# Altium PCB PCB-MAIN.PcbDoc (part 3 of 3)
Units mm, origin at the board's own origin, x right, y up, seen from the top; angles counter-clockwise.
Board outline 110 x 75 mm, 6 copper layers (F.Cu, In1.Cu, In2.Cu, In3.Cu, In4.Cu, B.Cu); 251 components, 186 nets, 1143 pads, 304 vias.
Unrouted connection lines stored in the file: 421.
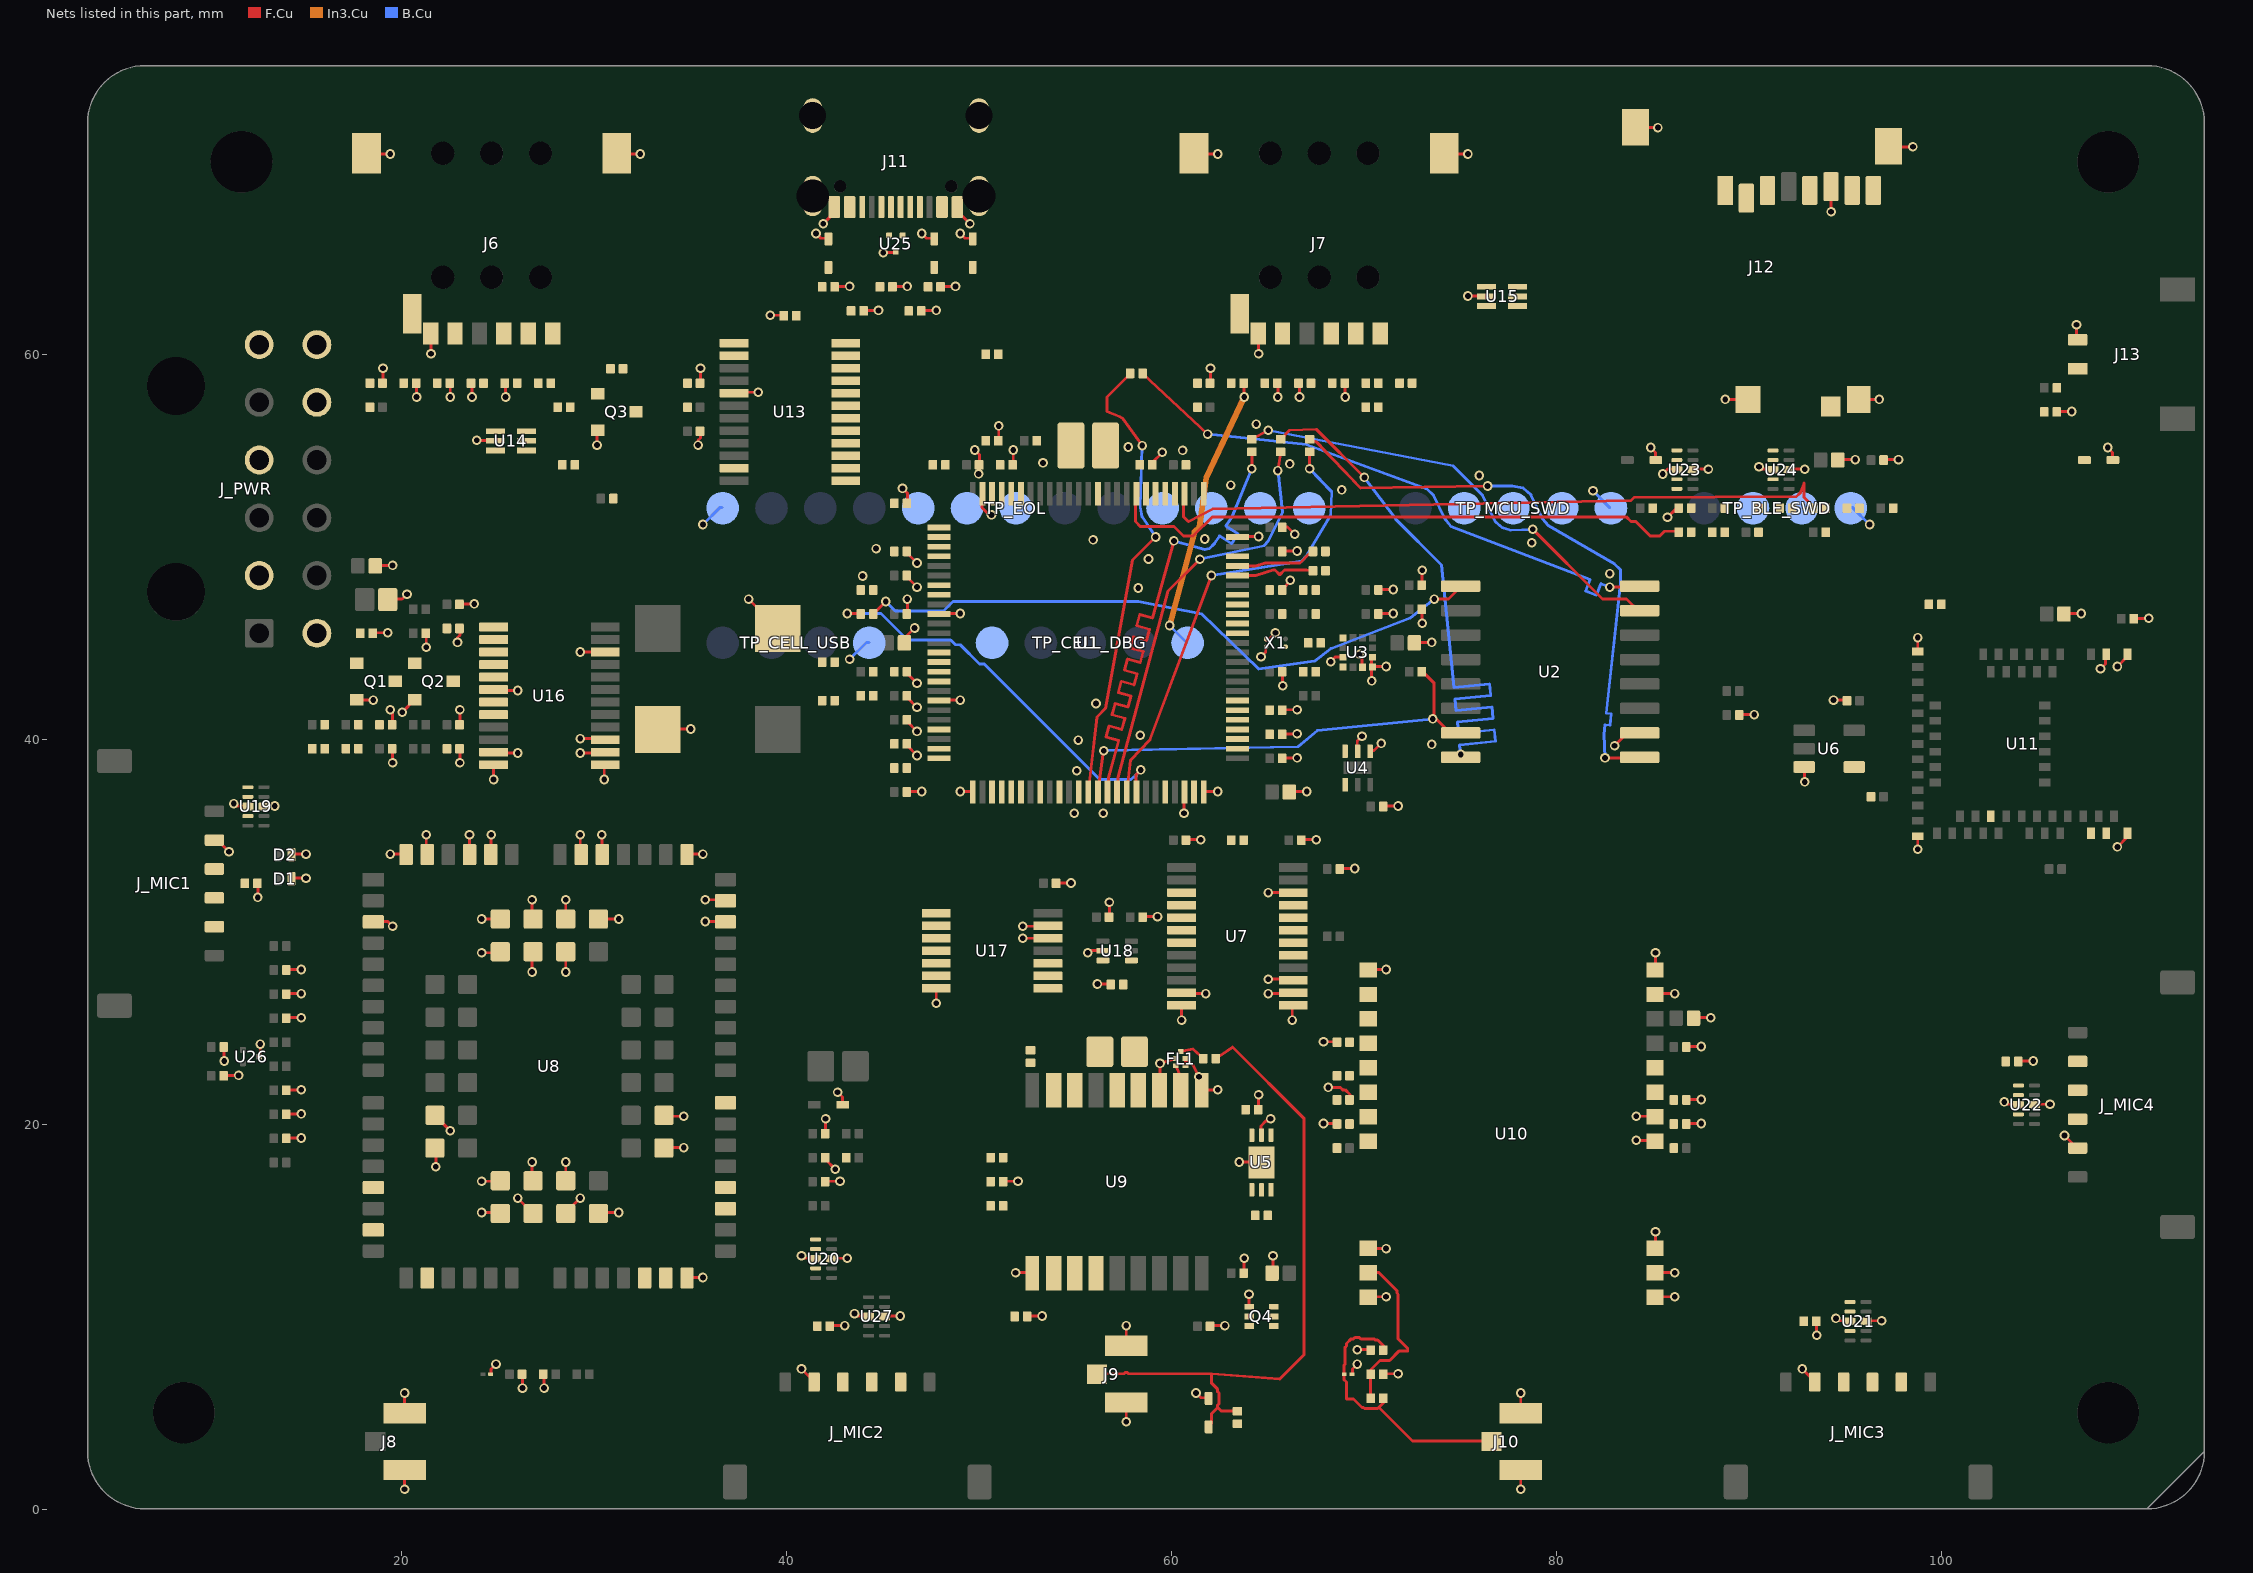
[diagram p6: the nets of this part, all layers, seen from the top]

## Via types
v1: diameter 0.5, hole 0.3, F.Cu to B.Cu, tented both sides, 304 vias

## Nets (pads, with @x,y where several pads share a name; then routed paths per layer and width w, separated by ;. In a path a pad name is that pad's centre, name@x,y a point inside that pad or via, vN(x,y) a via of type N, cw(c..) or ccw(c..) an arc to the next point about the centre after c; other vN are vias at no path point) (continued)
GND_DIGITAL: C1.2 C2.2 C3.2 C4.2 C5.2 C6.2 C7.2 C8.2 C9.2 C10.2 C11.2 C12.2 C13.2 C14.2 C15.2 C16.2 C17.2 C18.2 C19.2 C21.2 C22.2 C23.2 C24.2 C25.2 C26.2 C27.2 C28.2 C29.2 C31.2 C32.2 C60.2 C61.2 C62.2 C63.2 C65.2 C66.2 C67.2 C68.2 C69.2 C70.2 C71.2 C72.2 C73.2 C74.2 C75.2 C76.2 C77.2 C78.2 D4.2 D5.2 D6.2 D7.2 D8.2 D9.2 D11.2 FL1.B FL1.D FL1.E J9.SHIELD J10.SHIELD J11.A1 J11.A12 J11.B1 J11.B12 J12.6 J12.SHIELD J13.2 J_PWR.4 Q4.1 R2.2 R3.2 R5.2 R23.2 R60.2 R63.2 R64.2 R65.2 R66.2 R77.2 R93.2 R94.2 R96.2 R97.2 R98.2 TP_BLE_SWD.4 TP_EOL.1 TP_MCU_SWD.5 U1.10 U1.19 U1.26 U1.48 U1.50 U1.74 U1.99 U2.10 U3.3 U3.6 U3.7 U3.8 U4.4 U4.5 U5.5 U5.EP U6.3 U7.11 U7.12 U7.13 U7.14 U7.15 U7.22 U9.1 U9.10 U9.12 U10.1 U10.2 U10.3 U10.4 U10.5 U10.10 U10.11 U10.12 U10.20 U10.22 U11.1 U11.2 U11.15 U11.33 U11.55 U18.2 U23.3 U23.8 U24.3 U24.8 U25.3 X1.1 X1.4 | length 120.7
  F.Cu w0.15: C19.2@19.285,47.3 20.035,47.3 v1(20.285,47.55) ; v1(41.535,66.3) 41.785,66.05 D8.2@42.16,66.05 ; v1(41.91,66.8) 42.535,67.425 J11.B1@42.535,67.675 ; R94.2@42.535,63.55 v1(43.285,63.55) ; R98.2@44.035,62.3 v1(44.785,62.3) ; v1(45.035,65.3) U25.3@45.66,65.3 ; C77.2@45.535,63.55 v1(46.285,63.55) ; v1(46.035,53.05) 46.285,52.8 R96.2@46.285,52.3 ; C6.2@46.16,45.05 46.16,45.3 v1(46.66,45.8) ; C2.2@46.285,37.3 v1(47.035,37.3) ; C10.2@46.285,39.8 46.285,39.675 v1(46.785,39.175) ; C8.2@46.285,41.05 46.285,40.925 v1(46.785,40.425) ; C9.2@46.285,42.3 46.285,42.175 v1(46.785,41.675) ; C11.2@46.285,43.55 46.285,43.425 v1(46.785,42.925) ; C1.2@46.285,46.55 v1(46.285,47.3) ; C7.2@46.285,48.55 46.285,48.425 v1(46.785,47.925) ; R5.2@46.285,49.8 46.285,49.675 v1(46.785,49.175) ; R97.2@47.035,62.3 v1(47.785,62.3) ; v1(47.035,66.3) 47.285,66.05 D7.2@47.66,66.05 ; U1.19@47.91,42.05 v1(49.035,42.05) ; U1.10@47.91,46.55 v1(49.035,46.55) ; R93.2@48.035,63.55 v1(48.785,63.55) ; J11.B12@48.91,67.675 48.91,67.425 v1(49.535,66.8) ; v1(49.035,37.3) U1.26@49.66,37.3 ; v1(49.035,66.3) 49.285,66.05 D6.2@49.66,66.05 ; v1(49.785,55.05) 50.035,54.8 C5.2@50.035,54.3 ; U1.99@50.16,52.8 50.16,52.05 50.41,51.8 50.535,51.8 v1(50.66,51.675) ; C17.2@51.035,55.55 v1(51.035,56.3) ; C63.2@51.285,17.05 v1(52.035,17.05) ; C15.2@51.785,54.3 v1(51.785,55.05) ; v1(51.91,12.3) U9.1@52.785,12.3 ; R60.2@52.535,10.05 v1(53.285,10.05) ; v1(55.66,28.925) 55.785,29.05 U18.2@56.41,29.05 ; v1(56.16,27.3) R23.2@56.91,27.3 ; C31.2@56.785,30.8 v1(56.785,31.55) ; v1(57.66,4.55) J9.SHIELD@57.66,5.55 ; J9.SHIELD@57.66,8.55 v1(57.66,9.55) ; C32.2@58.535,30.8 v1(59.285,30.8) ; C18.2@59.035,54.3 59.035,54.425 v1(59.535,54.925) ; U9.12@59.41,21.8 v1(59.41,23.175) FL1.B@60.235,23.425 ; v1(60.535,25.425) U7.12@60.535,26.175 ; U7.11@60.535,26.8 v1(61.785,26.8) ; v1(60.66,36.175) U1.48@60.66,37.3 ; FL1.E@60.735,23.05 FL1.D@60.735,23.425 61.135,23.075 v1(61.435,22.475) ; C27.2@60.785,34.8 v1(61.535,34.8) ; v1(61.285,6.05) 61.535,5.8 D4.2@61.91,5.8 ; U9.10@61.535,21.8 v1(62.41,21.8) ; U1.50@61.66,37.3 v1(62.41,37.3) ; C62.2@62.035,9.55 v1(62.785,9.55) ; U1.74@63.41,50.55 v1(64.535,50.55) ; v1(63.535,18.05) U5.EP@64.66,18.05 ; C60.2@63.785,12.3 v1(63.785,13.05) ; Q4.1@64.035,10.55 v1(64.035,11.175) ; C65.2@64.535,20.8 v1(64.535,21.55) ; U5.5@64.66,19.425 64.66,19.925 64.91,20.175 65.035,20.175 v1(65.16,20.3) ; v1(64.66,44.3) 64.91,44.55 X1.1@64.91,44.8 ; X1.4@64.91,45.175 65.035,45.175 v1(65.41,45.55) ; v1(65.035,26.8) U7.14@66.285,26.8 ; v1(65.035,27.55) U7.15@66.285,27.55 ; v1(65.035,32.05) U7.22@66.285,32.05 ; C61.2@65.285,12.3 v1(65.285,13.175) ; C3.2@65.785,39.05 v1(66.535,39.05) ; C14.2@65.785,40.3 v1(66.535,40.3) ; C16.2@65.785,41.55 v1(66.535,41.55) ; v1(65.785,42.8) R2.2@65.785,43.55 ; R3.2@65.785,47.8 v1(66.185,48.275) ; C12.2@65.785,49.8 v1(66.535,49.8) ; C4.2@65.785,51.05 66.035,51.05 v1(66.41,50.675) ; C13.2@66.16,37.3 v1(67.035,37.3) ; v1(66.285,25.425) U7.13@66.285,26.175 ; C28.2@66.785,34.8 v1(67.535,34.8) ; v1(67.91,20.05) R63.2@68.66,20.05 ; v1(67.91,24.3) C68.2@68.66,24.3 ; v1(68.16,21.925) 68.785,21.925 68.91,21.8 69.035,21.8 69.285,21.55 R65.2@69.285,21.3 ; v1(68.285,44.05) 68.535,44.3 U3.3@68.91,44.3 ; C29.2@68.785,33.3 v1(69.535,33.3) ; D5.2@69.41,7.05 69.41,7.3 v1(69.66,7.55) ; v1(69.66,8.3) C70.2@70.41,8.3 ; U4.5@69.66,39.425 69.66,39.925 v1(69.91,40.175) ; v1(69.785,44.425) 69.91,44.3 U3.6@69.91,43.8 ; U10.22@70.285,11.05 v1(71.16,11.05) ; U10.20@70.285,13.55 v1(71.16,13.55) ; U10.12@70.285,28.05 v1(71.16,28.05) ; U4.4@70.285,39.425 70.535,39.425 v1(70.91,39.8) ; v1(70.41,43.05) U3.8@70.41,44.3 ; U3.7@70.41,43.8 v1(71.16,43.8) ; C23.2@70.785,46.55 v1(71.535,46.55) ; C25.2@70.785,47.8 v1(71.535,47.8) ; C69.2@71.035,7.05 v1(71.785,7.05) ; C26.2@71.035,36.55 v1(71.785,36.55) ; C24.2@72.66,45.05 v1(73.535,45.05) ; v1(73.035,46.05) C21.2@73.035,46.8 ; C22.2@73.035,48.05 v1(73.035,48.8) ; v1(78.16,1.05) J10.SHIELD@78.16,2.05 ; J10.SHIELD@78.16,5.05 v1(78.16,6.05) ; v1(83.035,39.675) 83.66,40.3 U2.10@84.285,40.3 ; v1(84.16,19.175) U10.4@85.16,19.175 ; v1(84.16,20.425) U10.5@85.16,20.425 ; J12.SHIELD@84.16,71.8 v1(85.285,71.8) ; v1(84.91,55.175) 85.16,54.925 D11.2@85.16,54.55 ; U10.1@85.16,11.05 v1(86.16,11.05) ; U10.2@85.16,12.3 v1(86.16,12.3) ; U10.3@85.16,13.55 v1(85.16,14.425) ; U10.10@85.16,26.8 v1(86.16,26.8) ; U10.11@85.16,28.05 v1(85.16,28.925) ; v1(85.535,53.8) 85.785,54.05 U23.3@86.285,54.05 ; v1(85.785,51.55) 86.285,52.05 C76.2@86.41,52.05 ; R64.2@86.785,20.05 v1(87.535,20.05) ; R66.2@86.785,21.3 v1(87.535,21.3) ; C66.2@86.785,24.05 v1(87.535,24.05) ; C67.2@87.16,25.55 v1(88.035,25.55) ; U23.8@87.16,54.05 v1(87.91,54.05) ; v1(88.785,57.675) J12.SHIELD@89.91,57.675 ; R77.2@89.535,41.3 v1(90.285,41.3) ; v1(90.535,54.175) 90.66,54.05 U24.3@91.285,54.05 ; U24.8@92.16,54.05 v1(92.91,54.05) ; v1(92.91,37.8) U6.3@92.91,38.55 ; v1(94.285,67.425) J12.6@94.285,68.675 ; v1(94.41,42.05) C73.2@95.16,42.05 ; C75.2@94.66,54.55 v1(95.535,54.55) ; J12.SHIELD@95.66,57.675 v1(96.785,57.675) ; C74.2@97.035,54.55 v1(97.785,54.55) ; J12.SHIELD@97.285,70.8 v1(98.535,70.8) ; v1(98.785,34.3) U11.33@98.785,34.925 ; U11.15@98.785,44.55 v1(98.785,45.3) ; C78.2@106.035,57.05 v1(106.785,57.05) ; C72.2@106.41,46.55 v1(107.285,46.55) ; J13.2@107.035,60.8 v1(107.035,61.55) ; v1(108.285,43.675) 108.535,43.925 U11.2@108.535,44.425 ; v1(108.66,55.175) 108.91,54.925 D9.2@108.91,54.55 ; v1(109.16,34.425) 109.66,34.925 U11.55@109.66,35.175 ; v1(109.16,43.8) 109.66,44.3 U11.1@109.66,44.425 ; C71.2@110.035,46.3 v1(110.785,46.3)
  B.Cu w0.15: v1(35.66,51.175) 36.535,52.05 TP_EOL.1@36.66,52.05 ; v1(81.91,52.925) TP_MCU_SWD.5@82.785,52.05 ; TP_BLE_SWD.4@95.285,52.05 95.41,52.05 v1(96.285,51.175)
  other v1: 54.96,36.175 56.46,36.175 55.085,38.375 73.535,39.75 55.16,39.975 58.385,40.225 56.085,41.875 58.285,47.875 43.96,48.5 82.785,48.625 58.814,49.384 44.66,49.925 78.735,50.225 55.935,50.375 61.735,50.425 68.86,52.975 63.085,53.225 76.001,53.725 49.985,53.805 66.16,54.325 53.335,54.375 60.585,55.025 57.76,55.2 64.411,56.392
GND_MIC: C20.2 C30.2 J_MIC1.2 J_MIC2.2 J_MIC3.2 J_MIC4.2 J_PWR.6 R19.2 R20.2 R21.2 R22.2 U17.7 U17.12 U17.13 U19.3 U19.8 U20.3 U20.8 U21.3 U21.8 U22.3 U22.8 | length 17.5
  F.Cu w0.15: J_MIC1.2@10.285,34.8 10.41,34.8 v1(11.035,34.175) ; v1(11.285,36.675) 11.41,36.55 U19.3@12.035,36.55 ; v1(12.535,31.8) R19.2@12.535,32.55 ; U19.8@12.91,36.55 v1(13.41,36.55) ; C20.2@18.66,49.05 v1(19.535,49.05) ; v1(40.785,7.3) J_MIC2.2@41.41,6.675 ; v1(40.785,13.175) 40.91,13.05 U20.3@41.535,13.05 ; R20.2@42.285,9.55 v1(43.035,9.55) ; U20.8@42.41,13.05 v1(43.16,13.05) ; v1(47.785,26.3) U17.7@47.785,27.05 ; v1(52.285,29.675) U17.12@53.535,29.675 ; v1(52.285,30.3) U17.13@53.535,30.3 ; C30.2@54.035,32.55 v1(54.785,32.55) ; v1(92.785,7.3) J_MIC3.2@93.41,6.675 ; v1(93.535,9.05) R21.2@93.535,9.8 ; v1(94.535,9.925) 94.66,9.8 U21.3@95.285,9.8 ; U21.8@96.16,9.8 v1(96.91,9.8) ; v1(103.285,21.175) 103.41,21.05 U22.3@104.035,21.05 ; R22.2@104.035,23.3 v1(104.785,23.3) ; U22.8@104.91,21.05 v1(105.66,21.05) ; v1(106.41,19.425) J_MIC4.2@107.035,18.8
GND_MODEM: C33.2 C34.2 C35.2 C36.2 C37.2 C38.2 C39.2 C40.2 C41.2 C42.2 C43.2 C44.2 C45.2 C46.2 C47.2 C48.2 C49.2 C50.2 C51.2 C52.2 C53.2 C54.2 C55.2 C56.2 C57.2 C58.2 C59.2 C79.2 C80.2 D1.2 D2.2 D3.2 D10.2 J6.4 J6.SHIELD J7.4 J7.SHIELD J8.SHIELD J_PWR.2 Q1.2 Q2.2 Q3.2 R25.2 R27.2 R29.2 R34.2 R35.2 R45.2 R47.2 TP_CELL_DBG.5 TP_CELL_USB.4 U8.3 U8.31 U8.47 U8.48 U8.50 U8.54 U8.55 U8.58 U8.59 U8.61 U8.62 U8.67 U8.68 U8.69 U8.70 U8.71 U8.72 U8.73 U8.74 U8.79 U8.80 U8.81 U8.82 U8.89 U8.90 U8.91 U8.100 U8.101 U8.102 U13.5 U14.2 U15.2 U16.6 U16.11 U16.12 U16.13 U16.14 U16.15 U16.22 U26.3 U27.3 U27.8 | length 101.3
  F.Cu w0.15: C37.2@10.785,22.55 v1(11.535,22.55) ; v1(10.785,23.3) C38.2@10.785,24.05 ; U26.3@12.66,23.55 v1(12.66,24.175) ; C45.2@14.035,19.3 v1(14.785,19.3) ; C41.2@14.035,20.55 v1(14.785,20.55) ; C39.2@14.035,21.8 v1(14.785,21.8) ; C40.2@14.035,25.55 v1(14.785,25.55) ; C43.2@14.035,26.8 v1(14.785,26.8) ; C47.2@14.035,28.05 v1(14.785,28.05) ; D1.2@14.285,32.8 v1(15.035,32.8) ; D2.2@14.285,34.05 v1(15.035,34.05) ; Q1.2@17.66,42.05 v1(18.535,42.05) ; J6.SHIELD@18.16,70.425 v1(19.41,70.425) ; U8.3@18.535,30.55 19.285,30.55 v1(19.535,30.3) ; R25.2@18.535,45.55 v1(19.285,45.55) ; C50.2@19.035,58.55 v1(19.035,59.3) ; v1(19.41,34.05) U8.62@20.285,34.05 ; v1(19.41,41.55) 19.535,41.425 R27.2@19.535,40.8 ; v1(19.535,38.8) R34.2@19.535,39.55 ; v1(20.035,41.425) Q2.2@20.66,42.05 ; v1(20.16,1.05) J8.SHIELD@20.16,2.05 ; J8.SHIELD@20.16,5.05 v1(20.16,6.05) ; v1(20.785,57.8) C52.2@20.785,58.55 ; U8.61@21.285,34.05 v1(21.285,35.05) ; v1(21.285,44.8) R29.2@21.285,45.55 ; v1(21.535,60.05) J6.4@21.535,61.05 ; v1(21.785,17.8) U8.68@21.785,18.8 ; U8.67@21.785,20.425 v1(22.535,19.675) ; v1(22.535,57.8) C54.2@22.535,58.55 ; v1(22.91,45.05) 22.91,45.3 23.035,45.425 C33.2@23.035,45.8 ; v1(23.035,38.8) C48.2@23.035,39.55 ; C35.2@23.035,40.8 v1(23.035,41.55) ; C34.2@23.035,47.05 v1(23.785,47.05) ; U8.59@23.535,34.05 v1(23.535,35.05) ; v1(23.66,57.8) C55.2@23.66,58.55 ; v1(23.91,55.55) U14.2@24.91,55.55 ; v1(24.16,15.425) U8.69@25.16,15.425 ; v1(24.16,17.05) U8.89@25.16,17.05 ; v1(24.16,28.925) U8.102@25.16,28.925 ; v1(24.16,30.675) U8.82@25.16,30.675 ; D3.2@24.66,7.05 24.66,7.3 v1(24.91,7.55) ; U8.58@24.66,34.05 v1(24.66,35.05) ; v1(24.785,37.925) U16.12@24.785,38.675 ; U16.11@24.785,39.3 v1(26.035,39.3) ; U16.6@24.785,42.55 v1(26.035,42.55) ; v1(25.41,57.8) C56.2@25.41,58.55 ; v1(26.035,16.175) U8.70@26.785,15.425 ; v1(26.285,6.3) C80.2@26.285,7.05 ; U8.90@26.785,17.05 v1(26.785,18.05) ; v1(26.785,27.925) U8.101@26.785,28.925 ; U8.81@26.785,30.675 v1(26.785,31.675) ; v1(27.41,6.3) C79.2@27.41,7.05 ; U8.71@28.535,15.425 v1(29.285,16.175) ; U8.91@28.535,17.05 v1(28.535,18.05) ; v1(28.535,27.925) U8.100@28.535,28.925 ; U8.80@28.535,30.675 v1(28.535,31.675) ; U8.55@29.285,34.05 v1(29.285,35.05) ; v1(29.285,39.3) U16.14@30.535,39.3 ; v1(29.285,40.05) U16.15@30.535,40.05 ; v1(29.285,44.55) U16.22@30.535,44.55 ; v1(30.16,55.3) Q3.2@30.16,56.05 ; U8.72@30.285,15.425 v1(31.285,15.425) ; U8.79@30.285,30.675 v1(31.285,30.675) ; U8.54@30.41,34.05 v1(30.41,35.05) ; v1(30.535,37.925) U16.13@30.535,38.675 ; J6.SHIELD@31.16,70.425 v1(32.41,70.425) ; C36.2@33.285,40.55 v1(35.035,40.55) ; U8.73@33.66,18.8 v1(34.66,18.8) ; U8.74@33.66,20.425 v1(34.66,20.425) ; U8.31@34.785,12.05 v1(35.66,12.05) ; U8.50@34.785,34.05 v1(35.66,34.05) ; v1(35.41,55.3) 35.41,55.55 35.535,55.675 C49.2@35.535,56.05 ; R47.2@35.535,58.55 v1(35.535,59.3) ; v1(35.785,30.55) U8.47@36.785,30.55 ; v1(35.785,31.675) U8.48@36.785,31.675 ; U13.5@37.285,58.05 v1(38.535,58.05) ; v1(38.035,47.3) C44.2@39.535,45.8 ; v1(39.16,62.05) R45.2@39.91,62.05 ; R35.2@42.035,17.05 v1(42.785,17.05) ; C46.2@42.035,18.3 42.035,18.175 v1(42.535,17.675) ; C42.2@42.035,19.55 v1(42.035,20.3) ; v1(42.66,21.675) 42.91,21.425 D10.2@42.91,21.05 ; v1(43.535,10.175) 43.66,10.05 U27.3@44.285,10.05 ; U27.8@45.16,10.05 v1(45.91,10.05) ; J7.SHIELD@61.16,70.425 v1(62.41,70.425) ; C51.2@62.035,58.55 v1(62.035,59.3) ; v1(63.785,57.8) C53.2@63.785,58.55 ; v1(64.535,60.05) J7.4@64.535,61.05 ; v1(65.535,57.8) C57.2@65.535,58.55 ; v1(66.66,57.8) C58.2@66.66,58.55 ; v1(69.035,57.8) C59.2@69.035,58.55 ; J7.SHIELD@74.16,70.425 v1(75.41,70.425) ; v1(75.41,63.05) U15.2@76.41,63.05
  In3.Cu w0.3: v1(59.91,45.925) 61.21,50.8 61.46,51.05 61.81,53.6 v1(63.785,57.8)
  B.Cu w0.15: v1(43.285,44.175) 44.16,45.05 TP_CELL_USB.4@44.285,45.05 ; v1(59.91,45.925) TP_CELL_DBG.5@60.785,45.05
GNSS_ANT_BIAS_RAW: C65.1 Q4.4 R61.1 U5.3 U5.4 U9.14
GNSS_ANT_DETECT: U5.6 U9.16
GNSS_ANT_DIV: R59.2 R60.1 U5.1
GNSS_ANT_GATE: Q4.5 Q4.6 R61.2
GNSS_ANT_OFF_N: Q4.2 U9.13
GNSS_ANT_SHORT_N: C63.1 L2.1 R62.2 U5.2 U9.17
GNSS_ANT_SWITCHED: Q4.3 R59.1 R62.1
GNSS_PPS_U1: R58.2 U1.22
GNSS_PPS_U9: R58.1 U9.4
GNSS_RF_ANT_BIASED: C64.1 D4.1 J9.1 L2.2 | length 34.1
  F.Cu w0.151: J9.1@56.16,7.05 57.535,7.05 57.597,7.113 57.722,7.113 57.785,7.05 62.097,7.05 ; D4.1@61.91,4.3 62.097,4.488 62.097,4.988 62.41,5.3 ; C64.1@62.31,23.425 63.185,24.025 66.885,20.325 66.885,8.025 65.635,6.775 62.097,7.05 ; L2.2@63.41,5.113 62.597,5.113 62.41,5.3 ; 62.097,7.05 62.097,6.55 62.41,6.238 62.41,6.112 62.472,6.05 62.472,5.487 62.41,5.425 62.41,5.3
GNSS_RF_DC_BLOCK: C64.2 FL1.C | length 1.4
  F.Cu w0.151: FL1.C@60.485,23.8 61.135,23.925 C64.2@61.66,23.425
GNSS_RF_FILTERED: FL1.A U9.11 | length 1.3
  F.Cu w0.151: FL1.A@60.235,23.05 60.485,22.475 U9.11@60.485,21.775
GNSS_RX_U1: R56.2 U1.25
GNSS_RX_U9: R56.1 U9.2
GNSS_TX_U1: R57.1 U1.24
GNSS_TX_U9: R57.2 U9.3
HW_REV0: R3.1 R4.2
HW_REV1: R5.1 R6.2
I2C2_SCL_BUS: J_PWR.11 R13.2 R15.2 TP_EOL.12 U3.1 U4.1
I2C2_SCL_U1: R15.1 U1.52
I2C2_SDA_BUS: J_PWR.12 R14.2 R16.2 TP_EOL.13 U3.4 U4.6
I2C2_SDA_U1: R16.1 U1.53
LORA_BUSY: R66.1 U1.56 U10.14
LORA_DIO1: R65.1 U1.17 U10.13
LORA_MISO_U1: R72.2 U1.30
LORA_MISO_U10: R72.1 U10.16
LORA_MOSI_U1: R71.1 U1.31
LORA_MOSI_U10: R71.2 U10.17
LORA_NSS_U1: R69.1 U1.28
LORA_NSS_U10: R68.2 R69.2 U10.19
LORA_RESET_N: C68.1 R67.2 U1.57 U10.15
LORA_RF_ANT: C70.1 D5.1 J10.1 R73.2 | length 14.5
  F.Cu w0.151: 70.785,5.3 72.535,3.55 J10.1@76.66,3.55 ; R73.2@71.035,5.8 71.035,5.55 70.722,5.238 70.035,5.238 69.972,5.3 69.91,5.3 69.472,5.738 69.097,5.738 69.097,6.613 68.972,6.737 68.972,7.488 69.035,7.55 69.035,8.425 69.097,8.488 69.097,8.613 69.347,8.863 69.472,8.863 69.535,8.925 69.785,8.925 69.847,8.863 70.535,8.863 70.597,8.8 70.722,8.8 71.035,8.488 C70.1@71.035,8.3
LORA_RF_MODULE: C69.1 R73.1 U10.21 | length 9
  F.Cu w0.151: U10.21@70.222,12.3 70.785,12.3 71.722,11.363 71.722,11.238 71.785,11.175 71.785,8.863 72.285,8.363 72.285,8.238 71.847,8.238 71.348,7.738 70.847,7.738 70.347,7.238 70.347,7.05 R73.1@70.347,5.8
LORA_RXEN: R64.1 U1.55 U10.6
LORA_SCK_U1: R70.1 U1.29
LORA_SCK_U10: R70.2 U10.18
LORA_TXEN: R63.1 U1.54 U10.7
LSE_IN: U1.8 X1.2
MIC_WAKE: R23.1 U1.67 U18.4
MIC_WAKE1: J_MIC1.5 R19.1 U17.1 U19.4
MIC_WAKE2: J_MIC2.5 R20.1 U17.2 U20.4
MIC_WAKE3: J_MIC3.5 R21.1 U17.4 U21.4
MIC_WAKE4: J_MIC4.5 R22.1 U17.5 U22.4
MIC_WAKE12_OR_1V8: U17.3 U17.9
MIC_WAKE34_OR_1V8: U17.6 U17.10
MIC_WAKE_OR_1V8: U17.8 U18.3
NOR_CLK_U1: R8.1 U1.38 | length 24.2
  F.Cu w0.15: U1.38@55.685,37.275 56.135,41.175 56.585,41.625 57.985,49.325 v1(59.185,50.525) ; R8.1@57.91,59.05 56.66,57.8 56.66,57.05 57.335,56.775 57.485,56.675 v1(58.485,55.275)
  B.Cu w0.15: v1(58.485,55.275) 58.385,52.075 58.485,51.575 v1(59.185,50.525)
NOR_CLK_U2: R8.2 U2.16 | length 30.4
  F.Cu w0.15: R8.2@58.51,59.025 v1(61.885,55.875) ; v1(82.785,47.925) U2.16@84.285,47.925
  B.Cu w0.15: v1(61.885,55.875) 67.035,55.325 73.285,53.025 73.635,52.675 74.185,51.525 74.535,51.075 81.757,48.317 81.529,47.72 82.09,47.506 82.318,48.103 v1(82.785,47.925)
NOR_IO0_U1: R9.1 U1.40 | length 30.8
  F.Cu w0.15: U1.40@56.685,37.275 56.735,38.025 57.268,39.953 56.603,40.137 56.763,40.715 57.428,40.531 57.588,41.109 56.922,41.293 57.082,41.872 57.747,41.688 57.907,42.266 57.242,42.45 57.402,43.028 58.067,42.844 58.227,43.423 57.562,43.606 57.722,44.185 58.387,44.001 58.547,44.579 57.882,44.763 58.041,45.341 58.707,45.158 58.866,45.736 58.201,45.92 58.361,46.498 59.026,46.314 v1(60.135,50.325) ; v1(64.185,54.075) R9.1@64.185,54.95
  B.Cu w0.15: v1(60.135,50.325) 61.735,49.875 61.985,49.925 62.235,50.175 62.509,50.593 63.136,50.182 63.465,50.684 62.838,51.095 63.185,51.625 v1(64.185,54.075)
NOR_IO0_U2: R9.2 U2.15 | length 23.8
  F.Cu w0.15: R9.2@64.185,55.6 v1(65.035,56.075) ; v1(78.785,50.925) 82.41,47.3 83.66,47.3 U2.15@84.285,46.675
  B.Cu w0.15: v1(65.035,56.075) 74.635,54.225 76.185,52.675 76.835,51.325 77.185,51.025 77.635,50.875 v1(78.785,50.925)
NOR_IO1_U1: R10.1 U1.41 | length 21.7
  F.Cu w0.15: U1.41@57.185,37.275 57.235,38.025 59.835,47.725 v1(61.485,49.375) ; v1(65.535,53.975) R10.1@65.685,54.95
  B.Cu w0.15: v1(61.485,49.375) 64.835,50.075 65.035,50.325 65.785,51.825 v1(65.535,53.975)
NOR_IO1_U2: R10.2 U2.8 | length 32.9
  F.Cu w0.15: R10.2@65.685,55.6 66.135,56.075 67.535,56.125 v1(70.035,53.625) ; U2.8@75.035,39.08 v1(75.035,39.225)
  B.Cu w0.15: v1(70.035,53.625) 71.685,51.425 74.035,49.075 74.681,42.707 76.539,42.896 76.599,42.299 74.742,42.11 74.803,41.513 76.66,41.702 76.72,41.105 74.863,40.916 74.924,40.319 76.781,40.508 76.842,39.911 74.984,39.722 v1(75.035,39.225)
NOR_IO2_U1: R11.1 U1.42 | length 23.6
  F.Cu w0.15: U1.42@57.685,37.275 57.885,38.925 58.885,39.975 v1(62.085,48.525) ; v1(67.185,54.075) R11.1@67.185,54.95
  B.Cu w0.15: v1(62.085,48.525) 66.785,49.275 67.035,49.575 68.285,51.675 68.335,52.875 v1(67.185,54.075)
NOR_IO2_U2: R11.2 U2.9 | length 31
  F.Cu w0.15: R11.2@67.185,55.6 67.535,55.475 69.835,53.075 v1(76.435,53.175) ; v1(82.535,39.05) U2.9@84.285,39.05
  B.Cu w0.15: v1(76.435,53.175) 77.735,53.175 78.285,53.075 78.685,52.725 79.285,51.475 79.585,51.125 83.035,49.125 83.335,48.825 83.335,48.125 82.603,41.369 82.862,41.341 82.797,40.744 82.539,40.772 82.485,40.275 v1(82.535,39.05)
NOR_IO3_U1: R12.1 U1.43 | length 21.1
  F.Cu w0.15: v1(43.16,46.55) R12.1@43.91,46.55 ; U1.43@58.16,37.3 58.16,38.175 v1(58.41,38.425)
  B.Cu w0.15: v1(43.16,46.55) 44.91,46.55 46.285,45.175 48.535,45.175 48.785,44.925 49.035,44.925 50.035,43.925 50.285,43.925 56.285,37.925 57.91,37.925 58.035,38.05 58.16,38.05 58.16,38.175 v1(58.41,38.425)
NOR_IO3_U2: R12.2 U2.1 | length 33.5
  F.Cu w0.15: R12.2@44.535,46.55 v1(45.16,47.175) ; v1(73.66,47.3) 74.41,47.3 U2.1@75.035,47.925
  B.Cu w0.15: v1(45.16,47.175) 45.66,46.675 48.16,46.675 48.66,47.175 58.285,47.175 61.585,46.525 64.535,43.675 67.435,44.075 68.285,44.725 72.435,46.325 v1(73.66,47.3)
NOR_NCS_U2: R7.2 U1.39 U2.7 | length 24.1
  F.Cu w0.15: U1.39@56.185,37.275 56.235,37.725 v1(56.485,39.425) ; R7.2@73.035,43.55 73.66,42.925 v1@73.66,41.175 ; v1(73.585,41.075) v1@73.66,41.175 ; U2.7@75.035,40.3 74.535,40.3 v1@73.66,41.175
  B.Cu w0.15: v1(56.485,39.425) 66.585,39.625 67.585,40.475 v1(73.585,41.075)
NRF_RESET_N: R78.2 U6.4 U11.40
NRF_SWCLK: TP_BLE_SWD.3 U11.53
NRF_SWDIO: TP_BLE_SWD.2 U11.51
NRST: C18.1 R1.2 TP_MCU_SWD.4 U1.14
PDM_CLK: U1.37 U7.17
PDM_CLK_1V8_FANOUT: J_MIC1.3 J_MIC2.3 J_MIC3.3 J_MIC4.3 R17.2 U19.1 U20.1 U21.1 U22.1
PDM_CLK_1V8_U7: R17.1 U7.7
PDM_DATA1: U1.33 U7.21
PDM_DATA1_1V8: J_MIC1.4 U7.3 U19.2
PDM_DATA2: U1.87 U7.20
PDM_DATA2_1V8: J_MIC2.4 U7.4 U20.2
PDM_DATA3: U1.35 U7.19
PDM_DATA3_1V8: J_MIC3.4 U7.5 U21.2
PDM_DATA4: U1.3 U7.18
PDM_DATA4_1V8: J_MIC4.4 U7.6 U22.2
PWR_FAULT: R103.2 U1.82
PWR_GOOD: J_PWR.7 TP_EOL.7 U1.81
Q1_BASE: Q1.1 R24.2 R25.1
Q2_BASE: Q2.1 R26.2 R27.1
Q3_BASE: Q3.1 R46.2 R47.1
REV_STRAP0: TP_EOL.10 U1.95
REV_STRAP1: TP_EOL.11 U1.96
SD_CK_CARD: J12.5 R79.2 U23.5
SD_CK_U1: R79.1 U1.80
SD_CMD_CARD: J12.3 R80.2 R85.2 U23.4
SD_CMD_U1: R80.1 U1.83 | length 31
  F.Cu w0.15: U1.83@58.135,52.825 58.135,51.325 58.385,51.075 60.135,51.075 60.635,50.575 61.135,50.575 62.135,51.575 83.635,51.575 83.885,51.325 84.135,51.325 84.885,50.575 85.385,50.575 85.635,50.825 R80.1@86.385,50.825
SD_D0_CARD: J12.7 R81.2 R86.2 U24.1
SD_D0_U1: R81.1 U1.65
SD_D1_CARD: J12.8 R82.2 R87.2 U24.2
SD_D1_U1: R82.1 U1.66
SD_D2_CARD: J12.1 R83.2 R88.2 U23.1
SD_D2_U1: R83.1 U1.78 | length 35.7
  F.Cu w0.15: U1.78@60.635,52.825 60.635,51.575 60.885,51.325 62.135,51.975 83.885,52.425 84.035,52.575 92.485,52.625 92.685,52.825 92.885,53.325 92.885,52.575 R83.1@93.385,52.075
SD_D3_CARD: J12.2 R84.2 R89.2 U23.2
SD_D3_U1: R84.1 U1.79
SD_DET: C76.1 J12.CD R90.2 U1.7 U24.4
SIM1_CLK_CONN: C55.1 J6.3 R51.2 U14.4
SIM1_CLK_MUX: R51.1 U13.23
SIM1_DATA_CONN: C56.1 J6.6 R52.2 U14.5
SIM1_DATA_MUX: R52.1 U13.19
SIM1_DET: C52.1 J6.7 R48.2 U1.2 U14.6
SIM1_RST_CONN: C54.1 J6.2 R50.2 U14.3
SIM1_RST_MUX: R50.1 U13.1
SIM1_VDD_CONN: C50.1 J6.1 U13.2 U13.21 U13.22 U14.1
SIM2_CLK_CONN: C58.1 J7.3 R54.2 U15.4
SIM2_CLK_MUX: R54.1 U13.15
SIM2_DATA_CONN: C59.1 J7.6 R55.2 U15.5
SIM2_DATA_MUX: R55.1 U13.18
SIM2_DET: C53.1 J7.7 R49.2 U1.4 U15.6
SIM2_RST_CONN: C57.1 J7.2 R53.2 U15.3
SIM2_RST_MUX: R53.1 U13.13
SIM2_VDD_CONN: C51.1 J7.1 U13.11 U13.16 U13.17 U15.1
SIM_MUX_EN: R46.1 U1.1
SIM_MUX_SEL: R45.1 U1.97 U13.14 U13.24
SMPS_SW: L1.1 U1.46
SWCLK: TP_MCU_SWD.3 U1.76
SWDIO: TP_MCU_SWD.2 U1.72
TAMPER_IN_CONN: D9.1 J13.1 R99.2 R100.1
TAMPER_IN_U1: C78.1 R100.2 U1.64
TEST_UART_RX_TP: R102.1 TP_EOL.6
TEST_UART_RX_U1: R102.2 U1.15
TEST_UART_TX_TP: R101.2 TP_EOL.5
TEST_UART_TX_U1: R101.1 U1.16
U8_MAIN_DTR_1V8: U8.30 U16.8
U8_MAIN_RI_1V8: R31.2 U8.39 U16.5
U8_MAIN_RXD_1V8: U8.34 U16.7
U8_MAIN_TXD_1V8: R30.2 U8.35 U16.3
U8_PWRKEY_N: C48.1 Q1.3 U8.15
U8_RESET_N: Q2.3 U8.17
U8_STATUS_1V8: U8.20 U16.4
U8_VDD_EXT_1V8: C33.1 R30.1 R31.1 R41.1 TP_CELL_DBG.1 U8.29 U16.1 U16.2
U13_EN_N: Q3.3 R44.2 U13.20
USB_CC1: D7.1 J11.A5 R93.1
USB_CC2: D8.1 J11.B5 R94.1
USB_DM_CONN: J11.A7 J11.B7 R92.2 U25.2
USB_DM_U1: R92.1 U1.70 | length 4.2
  F.Cu w0.154: U1.70@63.435,48.525 64.385,48.525 64.885,48.675 65.285,48.818 65.385,48.818 65.635,48.57 65.885,48.818 67.035,48.818 R92.1@67.36,48.775
USB_DP_CONN: J11.A6 J11.B6 R91.2 U25.1
USB_DP_U1: R91.1 U1.71 | length 4.2
  F.Cu w0.154: U1.71@63.435,49.025 64.385,49.025 64.885,49.175 66.685,49.175 67.135,49.625 R91.1@67.36,49.775
USB_SHIELD: C77.1 J11.SHIELD R97.1 R98.1
USB_VBUS_CONN: D6.1 J11.A4 J11.A9 J11.B4 J11.B9 R95.1
USB_VBUS_SENSE: R95.2 R96.1 U1.68
VCORE_1V1: C14.1 C15.1 C16.1 C17.1 L1.2 U1.49 U1.98
VREF+: C10.1 C11.1
pads on no net: D1.Un1 D1.Un2 D2.Un1 D2.Un2 H1.Un1 H2.Un1 H3.Un1 H4.Un1 J6.5 J6.Un1 J6.Un2 J6.Un3 J6.Un4 J6.Un5 J6.Un6 J7.5 J7.Un1 J7.Un2 J7.Un3 J7.Un4 J7.Un5 J7.Un6 J8.Un1 J8.Un2 J8.Un3 J9.Un1 J9.Un2 J9.Un3 J10.Un1 J10.Un2 J10.Un3 J11.A8 J11.B8 J11.Un1 J11.Un2 J13.Un1 J13.Un2 J_MIC1.Un1 J_MIC1.Un2 J_MIC2.Un1 J_MIC2.Un2 J_MIC3.Un1 J_MIC3.Un2 J_MIC4.Un1 J_MIC4.Un2 J_PWR.Un1 J_PWR.Un2 Q1.Un1 Q1.Un2 Q1.Un3 Q2.Un1 Q2.Un2 Q2.Un3 Q3.Un1 Q3.Un2 Q3.Un3 U1.9 U1.12 U1.13 U1.18 U1.23 U1.32 U1.36 U1.69 U1.84 U1.88 U1.89 U1.90 U1.91 U2.4 U2.5 U2.6 U2.11 U2.12 U2.13 U2.14 U3.5 U3.11 U4.2 U4.EP U6.1 U7.9 U7.10 U8.1 U8.2 U8.4 U8.5 U8.6 U8.7 U8.11 U8.12 U8.13 U8.14 U8.16 U8.18 U8.19 U8.21 U8.24 U8.25 U8.26 U8.27 U8.28 U8.36 U8.37 U8.38 U8.40 U8.41 U8.42 U8.49 U8.51 U8.56 U8.57 U8.63 U8.64 U8.65 U8.66 U8.76 U8.77 U8.78 U8.83 U8.84 U8.85 U8.86 U8.87 U8.88 U8.92 U8.93 U8.94 U8.95 U8.96 U8.97 U8.98 U8.99 U9.5 U9.6 U9.9 U9.15 U9.18 U10.8 U11.3 U11.4 U11.5 U11.6 U11.7 U11.8 U11.9 U11.10 U11.11 U11.12 U11.13 U11.14 U11.16 U11.17 U11.18 U11.19 U11.20 U11.21 U11.23 U11.25 U11.26 U11.27 U11.29 U11.31 U11.32 U11.34 U11.35 U11.36 U11.37 U11.38 U11.41 U11.42 U11.43 U11.44 U11.45 U11.46 U11.47 U11.48 U11.49 U11.50 U11.52 U11.54 U11.56 U11.57 U11.58 U11.59 U11.60 U11.61 U13.3 U16.9 U16.10 U16.18 U17.11 U19.6 U19.7 U19.9 U19.10 U19.Un1 U19.Un2 U20.6 U20.7 U20.9 U20.10 U20.Un1 U20.Un2 U21.6 U21.7 U21.9 U21.10 U21.Un1 U21.Un2 U22.6 U22.7 U22.9 U22.10 U22.Un1 U22.Un2 U23.6 U23.7 U23.9 U23.10 U23.Un1 U23.Un2 U24.5 U24.6 U24.7 U24.9 U24.10 U24.Un1 U24.Un2 U27.6 U27.7 U27.9 U27.10 U27.Un1 U27.Un2

## Polygon pours and split planes (outlines as drawn)
GND_MODEM on In1.Cu "In1.Cu-GND_MODEM" (solid, remove dead copper, pour order 9): 13.685,41.025 39.685,41.025 39.685,1.025 13.685,1.025
GND_DIGITAL on In1.Cu "In1.Cu-GND_DIGITAL" (solid, remove dead copper, pour order 4): 113.035,0.675 39.885,0.675 39.885,41.225 13.485,41.225 13.485,0.675 4.335,0.675 4.335,74.375 113.035,74.375
GND_MIC on In2.Cu "In2.Cu-GND_MIC" (solid, remove dead copper, pour order 7): 113.035,45.225 97.985,45.225 97.985,34.325 113.035,34.325 113.035,0.675 89.385,0.675 89.385,29.225 66.885,29.225 66.885,24.225 47.485,24.225 47.485,0.675 39.885,0.675 39.885,41.225 13.485,41.225 13.485,0.675 4.335,0.675 4.335,74.375 113.035,74.375
GND_MODEM on In4.Cu "In4.Cu-GND_MODEM-1" (solid, remove dead copper, pour order 6): 59.694,45.365 59.645,45.042 59.665,44.808 59.73,44.582 59.838,44.373 59.985,44.189 60.164,44.037 60.37,43.923 60.594,43.852 60.828,43.825 61.062,43.845 61.288,43.91 61.497,44.018 61.681,44.165 61.833,44.344 61.947,44.55 62.018,44.774 62.045,45.042 61.988,45.39 61.849,45.681 61.619,45.941 61.395,46.091 61.062,46.205 60.744,46.221 60.461,46.161 60.304,46.378 60.044,46.51 59.81,46.516 59.591,46.433 59.424,46.276 59.331,46.083 59.312,45.883 59.363,45.68 59.498,45.489
GND_MODEM on In4.Cu "In4.Cu-GND_MODEM" (solid, remove dead copper, pour order 5): 299 vertices, not listed, extent 8.612,0.675 79.488,72.125
GND_DIGITAL on In4.Cu "In4.Cu-GND_DIGITAL" (solid, remove dead copper, pour order 8): 113.035,0.675 113.035,74.375 4.335,74.375 4.335,0.675 13.485,0.675 13.485,41.225 39.885,41.225 39.885,0.675

## Keep-outs
F.Cu:
  region: 9.078,9.016 9.467,8.958 9.849,8.862 10.22,8.73 10.575,8.562 10.913,8.359 11.229,8.125 11.52,7.86 11.785,7.569 12.019,7.253 12.222,6.915 12.39,6.56 12.522,6.189 12.618,5.807 12.676,5.418 12.695,5.025 12.676,4.632 12.618,4.243 12.522,3.861 12.39,3.49 12.222,3.135 12.019,2.797 11.785,2.481 11.52,2.19 11.229,1.925 10.913,1.691 10.575,1.488 10.22,1.32 9.849,1.188 9.467,1.092 9.078,1.034 8.685,1.015 8.292,1.034 7.903,1.092 7.521,1.188 7.15,1.32 6.795,1.488 6.457,1.691 6.141,1.925 5.85,2.19 5.585,2.481 5.351,2.797 5.148,3.135 4.98,3.49 4.848,3.861 4.752,4.243 4.694,4.632 4.675,5.025 4.694,5.418 4.752,5.807 4.848,6.189 4.98,6.56 5.148,6.915 5.351,7.253 5.585,7.569 5.85,7.86 6.141,8.125 6.457,8.359 6.795,8.562 7.15,8.73 7.521,8.862 7.903,8.958 8.292,9.016 8.685,9.035
  region: 109.078,9.016 109.467,8.958 109.849,8.862 110.22,8.73 110.575,8.562 110.913,8.359 111.229,8.125 111.52,7.86 111.785,7.569 112.019,7.253 112.222,6.915 112.39,6.56 112.522,6.189 112.618,5.807 112.676,5.418 112.695,5.025 112.676,4.632 112.618,4.243 112.522,3.861 112.39,3.49 112.222,3.135 112.019,2.797 111.785,2.481 111.52,2.19 111.229,1.925 110.913,1.691 110.575,1.488 110.22,1.32 109.849,1.188 109.467,1.092 109.078,1.034 108.685,1.015 108.292,1.034 107.903,1.092 107.521,1.188 107.15,1.32 106.795,1.488 106.457,1.691 106.141,1.925 105.849,2.19 105.585,2.481 105.351,2.797 105.148,3.135 104.98,3.49 104.848,3.861 104.752,4.243 104.694,4.632 104.675,5.025 104.694,5.418 104.752,5.807 104.848,6.189 104.98,6.56 105.148,6.915 105.351,7.253 105.585,7.569 105.849,7.86 106.141,8.125 106.457,8.359 106.795,8.562 107.15,8.73 107.521,8.862 107.903,8.958 108.292,9.016 108.685,9.035
  region: 109.078,74.016 109.467,73.958 109.849,73.862 110.22,73.73 110.575,73.562 110.913,73.359 111.229,73.125 111.52,72.86 111.785,72.569 112.019,72.253 112.222,71.915 112.39,71.56 112.522,71.189 112.618,70.807 112.676,70.418 112.695,70.025 112.676,69.632 112.618,69.243 112.522,68.861 112.39,68.49 112.222,68.135 112.019,67.797 111.785,67.481 111.52,67.19 111.229,66.925 110.913,66.691 110.575,66.488 110.22,66.32 109.849,66.188 109.467,66.092 109.078,66.034 108.685,66.015 108.292,66.034 107.903,66.092 107.521,66.188 107.15,66.32 106.795,66.488 106.457,66.691 106.141,66.925 105.849,67.19 105.585,67.481 105.351,67.797 105.148,68.135 104.98,68.49 104.848,68.861 104.752,69.243 104.694,69.632 104.675,70.025 104.694,70.418 104.752,70.807 104.848,71.189 104.98,71.56 105.148,71.915 105.351,72.253 105.585,72.569 105.849,72.86 106.141,73.125 106.457,73.359 106.795,73.562 107.15,73.73 107.521,73.862 107.903,73.958 108.292,74.016 108.685,74.035
  region: 12.078,74.016 12.467,73.958 12.849,73.862 13.22,73.73 13.575,73.562 13.913,73.359 14.229,73.125 14.52,72.86 14.785,72.569 15.019,72.253 15.222,71.915 15.39,71.56 15.522,71.189 15.618,70.807 15.676,70.418 15.695,70.025 15.676,69.632 15.618,69.243 15.522,68.861 15.39,68.49 15.222,68.135 15.019,67.797 14.785,67.481 14.52,67.19 14.229,66.925 13.913,66.691 13.575,66.488 13.22,66.32 12.849,66.188 12.467,66.092 12.078,66.034 11.685,66.015 11.292,66.034 10.903,66.092 10.521,66.188 10.15,66.32 9.795,66.488 9.457,66.691 9.141,66.925 8.849,67.19 8.585,67.481 8.351,67.797 8.148,68.135 7.98,68.49 7.848,68.861 7.752,69.243 7.694,69.632 7.675,70.025 7.694,70.418 7.752,70.807 7.848,71.189 7.98,71.56 8.148,71.915 8.351,72.253 8.585,72.569 8.849,72.86 9.141,73.125 9.457,73.359 9.795,73.562 10.15,73.73 10.521,73.862 10.903,73.958 11.292,74.016 11.685,74.035
In1.Cu:
  region: 9.078,9.016 9.467,8.958 9.849,8.862 10.22,8.73 10.575,8.562 10.913,8.359 11.229,8.125 11.52,7.86 11.785,7.569 12.019,7.253 12.222,6.915 12.39,6.56 12.522,6.189 12.618,5.807 12.676,5.418 12.695,5.025 12.676,4.632 12.618,4.243 12.522,3.861 12.39,3.49 12.222,3.135 12.019,2.797 11.785,2.481 11.52,2.19 11.229,1.925 10.913,1.691 10.575,1.488 10.22,1.32 9.849,1.188 9.467,1.092 9.078,1.034 8.685,1.015 8.292,1.034 7.903,1.092 7.521,1.188 7.15,1.32 6.795,1.488 6.457,1.691 6.141,1.925 5.85,2.19 5.585,2.481 5.351,2.797 5.148,3.135 4.98,3.49 4.848,3.861 4.752,4.243 4.694,4.632 4.675,5.025 4.694,5.418 4.752,5.807 4.848,6.189 4.98,6.56 5.148,6.915 5.351,7.253 5.585,7.569 5.85,7.86 6.141,8.125 6.457,8.359 6.795,8.562 7.15,8.73 7.521,8.862 7.903,8.958 8.292,9.016 8.685,9.035
  region: 109.078,9.016 109.467,8.958 109.849,8.862 110.22,8.73 110.575,8.562 110.913,8.359 111.229,8.125 111.52,7.86 111.785,7.569 112.019,7.253 112.222,6.915 112.39,6.56 112.522,6.189 112.618,5.807 112.676,5.418 112.695,5.025 112.676,4.632 112.618,4.243 112.522,3.861 112.39,3.49 112.222,3.135 112.019,2.797 111.785,2.481 111.52,2.19 111.229,1.925 110.913,1.691 110.575,1.488 110.22,1.32 109.849,1.188 109.467,1.092 109.078,1.034 108.685,1.015 108.292,1.034 107.903,1.092 107.521,1.188 107.15,1.32 106.795,1.488 106.457,1.691 106.141,1.925 105.849,2.19 105.585,2.481 105.351,2.797 105.148,3.135 104.98,3.49 104.848,3.861 104.752,4.243 104.694,4.632 104.675,5.025 104.694,5.418 104.752,5.807 104.848,6.189 104.98,6.56 105.148,6.915 105.351,7.253 105.585,7.569 105.849,7.86 106.141,8.125 106.457,8.359 106.795,8.562 107.15,8.73 107.521,8.862 107.903,8.958 108.292,9.016 108.685,9.035
  region: 109.078,74.016 109.467,73.958 109.849,73.862 110.22,73.73 110.575,73.562 110.913,73.359 111.229,73.125 111.52,72.86 111.785,72.569 112.019,72.253 112.222,71.915 112.39,71.56 112.522,71.189 112.618,70.807 112.676,70.418 112.695,70.025 112.676,69.632 112.618,69.243 112.522,68.861 112.39,68.49 112.222,68.135 112.019,67.797 111.785,67.481 111.52,67.19 111.229,66.925 110.913,66.691 110.575,66.488 110.22,66.32 109.849,66.188 109.467,66.092 109.078,66.034 108.685,66.015 108.292,66.034 107.903,66.092 107.521,66.188 107.15,66.32 106.795,66.488 106.457,66.691 106.141,66.925 105.849,67.19 105.585,67.481 105.351,67.797 105.148,68.135 104.98,68.49 104.848,68.861 104.752,69.243 104.694,69.632 104.675,70.025 104.694,70.418 104.752,70.807 104.848,71.189 104.98,71.56 105.148,71.915 105.351,72.253 105.585,72.569 105.849,72.86 106.141,73.125 106.457,73.359 106.795,73.562 107.15,73.73 107.521,73.862 107.903,73.958 108.292,74.016 108.685,74.035
  region: 12.078,74.016 12.467,73.958 12.849,73.862 13.22,73.73 13.575,73.562 13.913,73.359 14.229,73.125 14.52,72.86 14.785,72.569 15.019,72.253 15.222,71.915 15.39,71.56 15.522,71.189 15.618,70.807 15.676,70.418 15.695,70.025 15.676,69.632 15.618,69.243 15.522,68.861 15.39,68.49 15.222,68.135 15.019,67.797 14.785,67.481 14.52,67.19 14.229,66.925 13.913,66.691 13.575,66.488 13.22,66.32 12.849,66.188 12.467,66.092 12.078,66.034 11.685,66.015 11.292,66.034 10.903,66.092 10.521,66.188 10.15,66.32 9.795,66.488 9.457,66.691 9.141,66.925 8.849,67.19 8.585,67.481 8.351,67.797 8.148,68.135 7.98,68.49 7.848,68.861 7.752,69.243 7.694,69.632 7.675,70.025 7.694,70.418 7.752,70.807 7.848,71.189 7.98,71.56 8.148,71.915 8.351,72.253 8.585,72.569 8.849,72.86 9.141,73.125 9.457,73.359 9.795,73.562 10.15,73.73 10.521,73.862 10.903,73.958 11.292,74.016 11.685,74.035
In2.Cu:
  region: 9.078,9.016 9.467,8.958 9.849,8.862 10.22,8.73 10.575,8.562 10.913,8.359 11.229,8.125 11.52,7.86 11.785,7.569 12.019,7.253 12.222,6.915 12.39,6.56 12.522,6.189 12.618,5.807 12.676,5.418 12.695,5.025 12.676,4.632 12.618,4.243 12.522,3.861 12.39,3.49 12.222,3.135 12.019,2.797 11.785,2.481 11.52,2.19 11.229,1.925 10.913,1.691 10.575,1.488 10.22,1.32 9.849,1.188 9.467,1.092 9.078,1.034 8.685,1.015 8.292,1.034 7.903,1.092 7.521,1.188 7.15,1.32 6.795,1.488 6.457,1.691 6.141,1.925 5.85,2.19 5.585,2.481 5.351,2.797 5.148,3.135 4.98,3.49 4.848,3.861 4.752,4.243 4.694,4.632 4.675,5.025 4.694,5.418 4.752,5.807 4.848,6.189 4.98,6.56 5.148,6.915 5.351,7.253 5.585,7.569 5.85,7.86 6.141,8.125 6.457,8.359 6.795,8.562 7.15,8.73 7.521,8.862 7.903,8.958 8.292,9.016 8.685,9.035
  region: 109.078,9.016 109.467,8.958 109.849,8.862 110.22,8.73 110.575,8.562 110.913,8.359 111.229,8.125 111.52,7.86 111.785,7.569 112.019,7.253 112.222,6.915 112.39,6.56 112.522,6.189 112.618,5.807 112.676,5.418 112.695,5.025 112.676,4.632 112.618,4.243 112.522,3.861 112.39,3.49 112.222,3.135 112.019,2.797 111.785,2.481 111.52,2.19 111.229,1.925 110.913,1.691 110.575,1.488 110.22,1.32 109.849,1.188 109.467,1.092 109.078,1.034 108.685,1.015 108.292,1.034 107.903,1.092 107.521,1.188 107.15,1.32 106.795,1.488 106.457,1.691 106.141,1.925 105.849,2.19 105.585,2.481 105.351,2.797 105.148,3.135 104.98,3.49 104.848,3.861 104.752,4.243 104.694,4.632 104.675,5.025 104.694,5.418 104.752,5.807 104.848,6.189 104.98,6.56 105.148,6.915 105.351,7.253 105.585,7.569 105.849,7.86 106.141,8.125 106.457,8.359 106.795,8.562 107.15,8.73 107.521,8.862 107.903,8.958 108.292,9.016 108.685,9.035
  region: 109.078,74.016 109.467,73.958 109.849,73.862 110.22,73.73 110.575,73.562 110.913,73.359 111.229,73.125 111.52,72.86 111.785,72.569 112.019,72.253 112.222,71.915 112.39,71.56 112.522,71.189 112.618,70.807 112.676,70.418 112.695,70.025 112.676,69.632 112.618,69.243 112.522,68.861 112.39,68.49 112.222,68.135 112.019,67.797 111.785,67.481 111.52,67.19 111.229,66.925 110.913,66.691 110.575,66.488 110.22,66.32 109.849,66.188 109.467,66.092 109.078,66.034 108.685,66.015 108.292,66.034 107.903,66.092 107.521,66.188 107.15,66.32 106.795,66.488 106.457,66.691 106.141,66.925 105.849,67.19 105.585,67.481 105.351,67.797 105.148,68.135 104.98,68.49 104.848,68.861 104.752,69.243 104.694,69.632 104.675,70.025 104.694,70.418 104.752,70.807 104.848,71.189 104.98,71.56 105.148,71.915 105.351,72.253 105.585,72.569 105.849,72.86 106.141,73.125 106.457,73.359 106.795,73.562 107.15,73.73 107.521,73.862 107.903,73.958 108.292,74.016 108.685,74.035
  region: 12.078,74.016 12.467,73.958 12.849,73.862 13.22,73.73 13.575,73.562 13.913,73.359 14.229,73.125 14.52,72.86 14.785,72.569 15.019,72.253 15.222,71.915 15.39,71.56 15.522,71.189 15.618,70.807 15.676,70.418 15.695,70.025 15.676,69.632 15.618,69.243 15.522,68.861 15.39,68.49 15.222,68.135 15.019,67.797 14.785,67.481 14.52,67.19 14.229,66.925 13.913,66.691 13.575,66.488 13.22,66.32 12.849,66.188 12.467,66.092 12.078,66.034 11.685,66.015 11.292,66.034 10.903,66.092 10.521,66.188 10.15,66.32 9.795,66.488 9.457,66.691 9.141,66.925 8.849,67.19 8.585,67.481 8.351,67.797 8.148,68.135 7.98,68.49 7.848,68.861 7.752,69.243 7.694,69.632 7.675,70.025 7.694,70.418 7.752,70.807 7.848,71.189 7.98,71.56 8.148,71.915 8.351,72.253 8.585,72.569 8.849,72.86 9.141,73.125 9.457,73.359 9.795,73.562 10.15,73.73 10.521,73.862 10.903,73.958 11.292,74.016 11.685,74.035
In3.Cu:
  region: 9.078,9.016 9.467,8.958 9.849,8.862 10.22,8.73 10.575,8.562 10.913,8.359 11.229,8.125 11.52,7.86 11.785,7.569 12.019,7.253 12.222,6.915 12.39,6.56 12.522,6.189 12.618,5.807 12.676,5.418 12.695,5.025 12.676,4.632 12.618,4.243 12.522,3.861 12.39,3.49 12.222,3.135 12.019,2.797 11.785,2.481 11.52,2.19 11.229,1.925 10.913,1.691 10.575,1.488 10.22,1.32 9.849,1.188 9.467,1.092 9.078,1.034 8.685,1.015 8.292,1.034 7.903,1.092 7.521,1.188 7.15,1.32 6.795,1.488 6.457,1.691 6.141,1.925 5.85,2.19 5.585,2.481 5.351,2.797 5.148,3.135 4.98,3.49 4.848,3.861 4.752,4.243 4.694,4.632 4.675,5.025 4.694,5.418 4.752,5.807 4.848,6.189 4.98,6.56 5.148,6.915 5.351,7.253 5.585,7.569 5.85,7.86 6.141,8.125 6.457,8.359 6.795,8.562 7.15,8.73 7.521,8.862 7.903,8.958 8.292,9.016 8.685,9.035
  region: 109.078,9.016 109.467,8.958 109.849,8.862 110.22,8.73 110.575,8.562 110.913,8.359 111.229,8.125 111.52,7.86 111.785,7.569 112.019,7.253 112.222,6.915 112.39,6.56 112.522,6.189 112.618,5.807 112.676,5.418 112.695,5.025 112.676,4.632 112.618,4.243 112.522,3.861 112.39,3.49 112.222,3.135 112.019,2.797 111.785,2.481 111.52,2.19 111.229,1.925 110.913,1.691 110.575,1.488 110.22,1.32 109.849,1.188 109.467,1.092 109.078,1.034 108.685,1.015 108.292,1.034 107.903,1.092 107.521,1.188 107.15,1.32 106.795,1.488 106.457,1.691 106.141,1.925 105.849,2.19 105.585,2.481 105.351,2.797 105.148,3.135 104.98,3.49 104.848,3.861 104.752,4.243 104.694,4.632 104.675,5.025 104.694,5.418 104.752,5.807 104.848,6.189 104.98,6.56 105.148,6.915 105.351,7.253 105.585,7.569 105.849,7.86 106.141,8.125 106.457,8.359 106.795,8.562 107.15,8.73 107.521,8.862 107.903,8.958 108.292,9.016 108.685,9.035
  region: 109.078,74.016 109.467,73.958 109.849,73.862 110.22,73.73 110.575,73.562 110.913,73.359 111.229,73.125 111.52,72.86 111.785,72.569 112.019,72.253 112.222,71.915 112.39,71.56 112.522,71.189 112.618,70.807 112.676,70.418 112.695,70.025 112.676,69.632 112.618,69.243 112.522,68.861 112.39,68.49 112.222,68.135 112.019,67.797 111.785,67.481 111.52,67.19 111.229,66.925 110.913,66.691 110.575,66.488 110.22,66.32 109.849,66.188 109.467,66.092 109.078,66.034 108.685,66.015 108.292,66.034 107.903,66.092 107.521,66.188 107.15,66.32 106.795,66.488 106.457,66.691 106.141,66.925 105.849,67.19 105.585,67.481 105.351,67.797 105.148,68.135 104.98,68.49 104.848,68.861 104.752,69.243 104.694,69.632 104.675,70.025 104.694,70.418 104.752,70.807 104.848,71.189 104.98,71.56 105.148,71.915 105.351,72.253 105.585,72.569 105.849,72.86 106.141,73.125 106.457,73.359 106.795,73.562 107.15,73.73 107.521,73.862 107.903,73.958 108.292,74.016 108.685,74.035
  region: 12.078,74.016 12.467,73.958 12.849,73.862 13.22,73.73 13.575,73.562 13.913,73.359 14.229,73.125 14.52,72.86 14.785,72.569 15.019,72.253 15.222,71.915 15.39,71.56 15.522,71.189 15.618,70.807 15.676,70.418 15.695,70.025 15.676,69.632 15.618,69.243 15.522,68.861 15.39,68.49 15.222,68.135 15.019,67.797 14.785,67.481 14.52,67.19 14.229,66.925 13.913,66.691 13.575,66.488 13.22,66.32 12.849,66.188 12.467,66.092 12.078,66.034 11.685,66.015 11.292,66.034 10.903,66.092 10.521,66.188 10.15,66.32 9.795,66.488 9.457,66.691 9.141,66.925 8.849,67.19 8.585,67.481 8.351,67.797 8.148,68.135 7.98,68.49 7.848,68.861 7.752,69.243 7.694,69.632 7.675,70.025 7.694,70.418 7.752,70.807 7.848,71.189 7.98,71.56 8.148,71.915 8.351,72.253 8.585,72.569 8.849,72.86 9.141,73.125 9.457,73.359 9.795,73.562 10.15,73.73 10.521,73.862 10.903,73.958 11.292,74.016 11.685,74.035
In4.Cu:
  region: 9.078,9.016 9.467,8.958 9.849,8.862 10.22,8.73 10.575,8.562 10.913,8.359 11.229,8.125 11.52,7.86 11.785,7.569 12.019,7.253 12.222,6.915 12.39,6.56 12.522,6.189 12.618,5.807 12.676,5.418 12.695,5.025 12.676,4.632 12.618,4.243 12.522,3.861 12.39,3.49 12.222,3.135 12.019,2.797 11.785,2.481 11.52,2.19 11.229,1.925 10.913,1.691 10.575,1.488 10.22,1.32 9.849,1.188 9.467,1.092 9.078,1.034 8.685,1.015 8.292,1.034 7.903,1.092 7.521,1.188 7.15,1.32 6.795,1.488 6.457,1.691 6.141,1.925 5.85,2.19 5.585,2.481 5.351,2.797 5.148,3.135 4.98,3.49 4.848,3.861 4.752,4.243 4.694,4.632 4.675,5.025 4.694,5.418 4.752,5.807 4.848,6.189 4.98,6.56 5.148,6.915 5.351,7.253 5.585,7.569 5.85,7.86 6.141,8.125 6.457,8.359 6.795,8.562 7.15,8.73 7.521,8.862 7.903,8.958 8.292,9.016 8.685,9.035
  region: 109.078,9.016 109.467,8.958 109.849,8.862 110.22,8.73 110.575,8.562 110.913,8.359 111.229,8.125 111.52,7.86 111.785,7.569 112.019,7.253 112.222,6.915 112.39,6.56 112.522,6.189 112.618,5.807 112.676,5.418 112.695,5.025 112.676,4.632 112.618,4.243 112.522,3.861 112.39,3.49 112.222,3.135 112.019,2.797 111.785,2.481 111.52,2.19 111.229,1.925 110.913,1.691 110.575,1.488 110.22,1.32 109.849,1.188 109.467,1.092 109.078,1.034 108.685,1.015 108.292,1.034 107.903,1.092 107.521,1.188 107.15,1.32 106.795,1.488 106.457,1.691 106.141,1.925 105.849,2.19 105.585,2.481 105.351,2.797 105.148,3.135 104.98,3.49 104.848,3.861 104.752,4.243 104.694,4.632 104.675,5.025 104.694,5.418 104.752,5.807 104.848,6.189 104.98,6.56 105.148,6.915 105.351,7.253 105.585,7.569 105.849,7.86 106.141,8.125 106.457,8.359 106.795,8.562 107.15,8.73 107.521,8.862 107.903,8.958 108.292,9.016 108.685,9.035
  region: 109.078,74.016 109.467,73.958 109.849,73.862 110.22,73.73 110.575,73.562 110.913,73.359 111.229,73.125 111.52,72.86 111.785,72.569 112.019,72.253 112.222,71.915 112.39,71.56 112.522,71.189 112.618,70.807 112.676,70.418 112.695,70.025 112.676,69.632 112.618,69.243 112.522,68.861 112.39,68.49 112.222,68.135 112.019,67.797 111.785,67.481 111.52,67.19 111.229,66.925 110.913,66.691 110.575,66.488 110.22,66.32 109.849,66.188 109.467,66.092 109.078,66.034 108.685,66.015 108.292,66.034 107.903,66.092 107.521,66.188 107.15,66.32 106.795,66.488 106.457,66.691 106.141,66.925 105.849,67.19 105.585,67.481 105.351,67.797 105.148,68.135 104.98,68.49 104.848,68.861 104.752,69.243 104.694,69.632 104.675,70.025 104.694,70.418 104.752,70.807 104.848,71.189 104.98,71.56 105.148,71.915 105.351,72.253 105.585,72.569 105.849,72.86 106.141,73.125 106.457,73.359 106.795,73.562 107.15,73.73 107.521,73.862 107.903,73.958 108.292,74.016 108.685,74.035
  region: 12.078,74.016 12.467,73.958 12.849,73.862 13.22,73.73 13.575,73.562 13.913,73.359 14.229,73.125 14.52,72.86 14.785,72.569 15.019,72.253 15.222,71.915 15.39,71.56 15.522,71.189 15.618,70.807 15.676,70.418 15.695,70.025 15.676,69.632 15.618,69.243 15.522,68.861 15.39,68.49 15.222,68.135 15.019,67.797 14.785,67.481 14.52,67.19 14.229,66.925 13.913,66.691 13.575,66.488 13.22,66.32 12.849,66.188 12.467,66.092 12.078,66.034 11.685,66.015 11.292,66.034 10.903,66.092 10.521,66.188 10.15,66.32 9.795,66.488 9.457,66.691 9.141,66.925 8.849,67.19 8.585,67.481 8.351,67.797 8.148,68.135 7.98,68.49 7.848,68.861 7.752,69.243 7.694,69.632 7.675,70.025 7.694,70.418 7.752,70.807 7.848,71.189 7.98,71.56 8.148,71.915 8.351,72.253 8.585,72.569 8.849,72.86 9.141,73.125 9.457,73.359 9.795,73.562 10.15,73.73 10.521,73.862 10.903,73.958 11.292,74.016 11.685,74.035
B.Cu:
  region: 9.078,9.016 9.467,8.958 9.849,8.862 10.22,8.73 10.575,8.562 10.913,8.359 11.229,8.125 11.52,7.86 11.785,7.569 12.019,7.253 12.222,6.915 12.39,6.56 12.522,6.189 12.618,5.807 12.676,5.418 12.695,5.025 12.676,4.632 12.618,4.243 12.522,3.861 12.39,3.49 12.222,3.135 12.019,2.797 11.785,2.481 11.52,2.19 11.229,1.925 10.913,1.691 10.575,1.488 10.22,1.32 9.849,1.188 9.467,1.092 9.078,1.034 8.685,1.015 8.292,1.034 7.903,1.092 7.521,1.188 7.15,1.32 6.795,1.488 6.457,1.691 6.141,1.925 5.85,2.19 5.585,2.481 5.351,2.797 5.148,3.135 4.98,3.49 4.848,3.861 4.752,4.243 4.694,4.632 4.675,5.025 4.694,5.418 4.752,5.807 4.848,6.189 4.98,6.56 5.148,6.915 5.351,7.253 5.585,7.569 5.85,7.86 6.141,8.125 6.457,8.359 6.795,8.562 7.15,8.73 7.521,8.862 7.903,8.958 8.292,9.016 8.685,9.035
  region: 109.078,9.016 109.467,8.958 109.849,8.862 110.22,8.73 110.575,8.562 110.913,8.359 111.229,8.125 111.52,7.86 111.785,7.569 112.019,7.253 112.222,6.915 112.39,6.56 112.522,6.189 112.618,5.807 112.676,5.418 112.695,5.025 112.676,4.632 112.618,4.243 112.522,3.861 112.39,3.49 112.222,3.135 112.019,2.797 111.785,2.481 111.52,2.19 111.229,1.925 110.913,1.691 110.575,1.488 110.22,1.32 109.849,1.188 109.467,1.092 109.078,1.034 108.685,1.015 108.292,1.034 107.903,1.092 107.521,1.188 107.15,1.32 106.795,1.488 106.457,1.691 106.141,1.925 105.849,2.19 105.585,2.481 105.351,2.797 105.148,3.135 104.98,3.49 104.848,3.861 104.752,4.243 104.694,4.632 104.675,5.025 104.694,5.418 104.752,5.807 104.848,6.189 104.98,6.56 105.148,6.915 105.351,7.253 105.585,7.569 105.849,7.86 106.141,8.125 106.457,8.359 106.795,8.562 107.15,8.73 107.521,8.862 107.903,8.958 108.292,9.016 108.685,9.035
  region: 109.078,74.016 109.467,73.958 109.849,73.862 110.22,73.73 110.575,73.562 110.913,73.359 111.229,73.125 111.52,72.86 111.785,72.569 112.019,72.253 112.222,71.915 112.39,71.56 112.522,71.189 112.618,70.807 112.676,70.418 112.695,70.025 112.676,69.632 112.618,69.243 112.522,68.861 112.39,68.49 112.222,68.135 112.019,67.797 111.785,67.481 111.52,67.19 111.229,66.925 110.913,66.691 110.575,66.488 110.22,66.32 109.849,66.188 109.467,66.092 109.078,66.034 108.685,66.015 108.292,66.034 107.903,66.092 107.521,66.188 107.15,66.32 106.795,66.488 106.457,66.691 106.141,66.925 105.849,67.19 105.585,67.481 105.351,67.797 105.148,68.135 104.98,68.49 104.848,68.861 104.752,69.243 104.694,69.632 104.675,70.025 104.694,70.418 104.752,70.807 104.848,71.189 104.98,71.56 105.148,71.915 105.351,72.253 105.585,72.569 105.849,72.86 106.141,73.125 106.457,73.359 106.795,73.562 107.15,73.73 107.521,73.862 107.903,73.958 108.292,74.016 108.685,74.035
  region: 12.078,74.016 12.467,73.958 12.849,73.862 13.22,73.73 13.575,73.562 13.913,73.359 14.229,73.125 14.52,72.86 14.785,72.569 15.019,72.253 15.222,71.915 15.39,71.56 15.522,71.189 15.618,70.807 15.676,70.418 15.695,70.025 15.676,69.632 15.618,69.243 15.522,68.861 15.39,68.49 15.222,68.135 15.019,67.797 14.785,67.481 14.52,67.19 14.229,66.925 13.913,66.691 13.575,66.488 13.22,66.32 12.849,66.188 12.467,66.092 12.078,66.034 11.685,66.015 11.292,66.034 10.903,66.092 10.521,66.188 10.15,66.32 9.795,66.488 9.457,66.691 9.141,66.925 8.849,67.19 8.585,67.481 8.351,67.797 8.148,68.135 7.98,68.49 7.848,68.861 7.752,69.243 7.694,69.632 7.675,70.025 7.694,70.418 7.752,70.807 7.848,71.189 7.98,71.56 8.148,71.915 8.351,72.253 8.585,72.569 8.849,72.86 9.141,73.125 9.457,73.359 9.795,73.562 10.15,73.73 10.521,73.862 10.903,73.958 11.292,74.016 11.685,74.035
Edge.Cuts:
  lines w0: 110.685,0.025 ccw(c110.684,3.026) 113.685,3.025 ; 110.685,0.025 ccw(c110.684,3.026) 113.685,3.025 ; 110.685,0.025 113.685,3.025 ; 110.685,0.025 6.685,0.025 cw(c6.686,3.026) 3.685,3.025 3.685,72.025 cw(c6.686,72.024) 6.685,75.025 110.685,75.025 cw(c110.684,72.024) 113.685,72.025 113.685,3.025
  lines w0.254: 110.685,0.025 ccw(c110.684,3.026) 113.685,3.025 ; 110.685,0.025 ccw(c110.684,3.026) 113.685,3.025 ; 110.685,0.025 6.685,0.025 cw(c6.686,3.026) 3.685,3.025 3.685,72.025 cw(c6.686,72.024) 6.685,75.025 110.685,75.025 cw(c110.684,72.024) 113.685,72.025 113.685,3.025